# Altium PCB da12_v100.PcbDoc (part 4 of 5)
Units mil, origin at the board's own origin, x right, y up, seen from the top; angles counter-clockwise.
Board outline 4646.03 x 3622.4 mil, 4 copper layers (Top Layer, GND, POWER, Bottom Layer), stack 23.756 mil thick; 376 components, 191 nets, 1000 pads, 352 vias.
Unrouted connection lines stored in the file: 152.
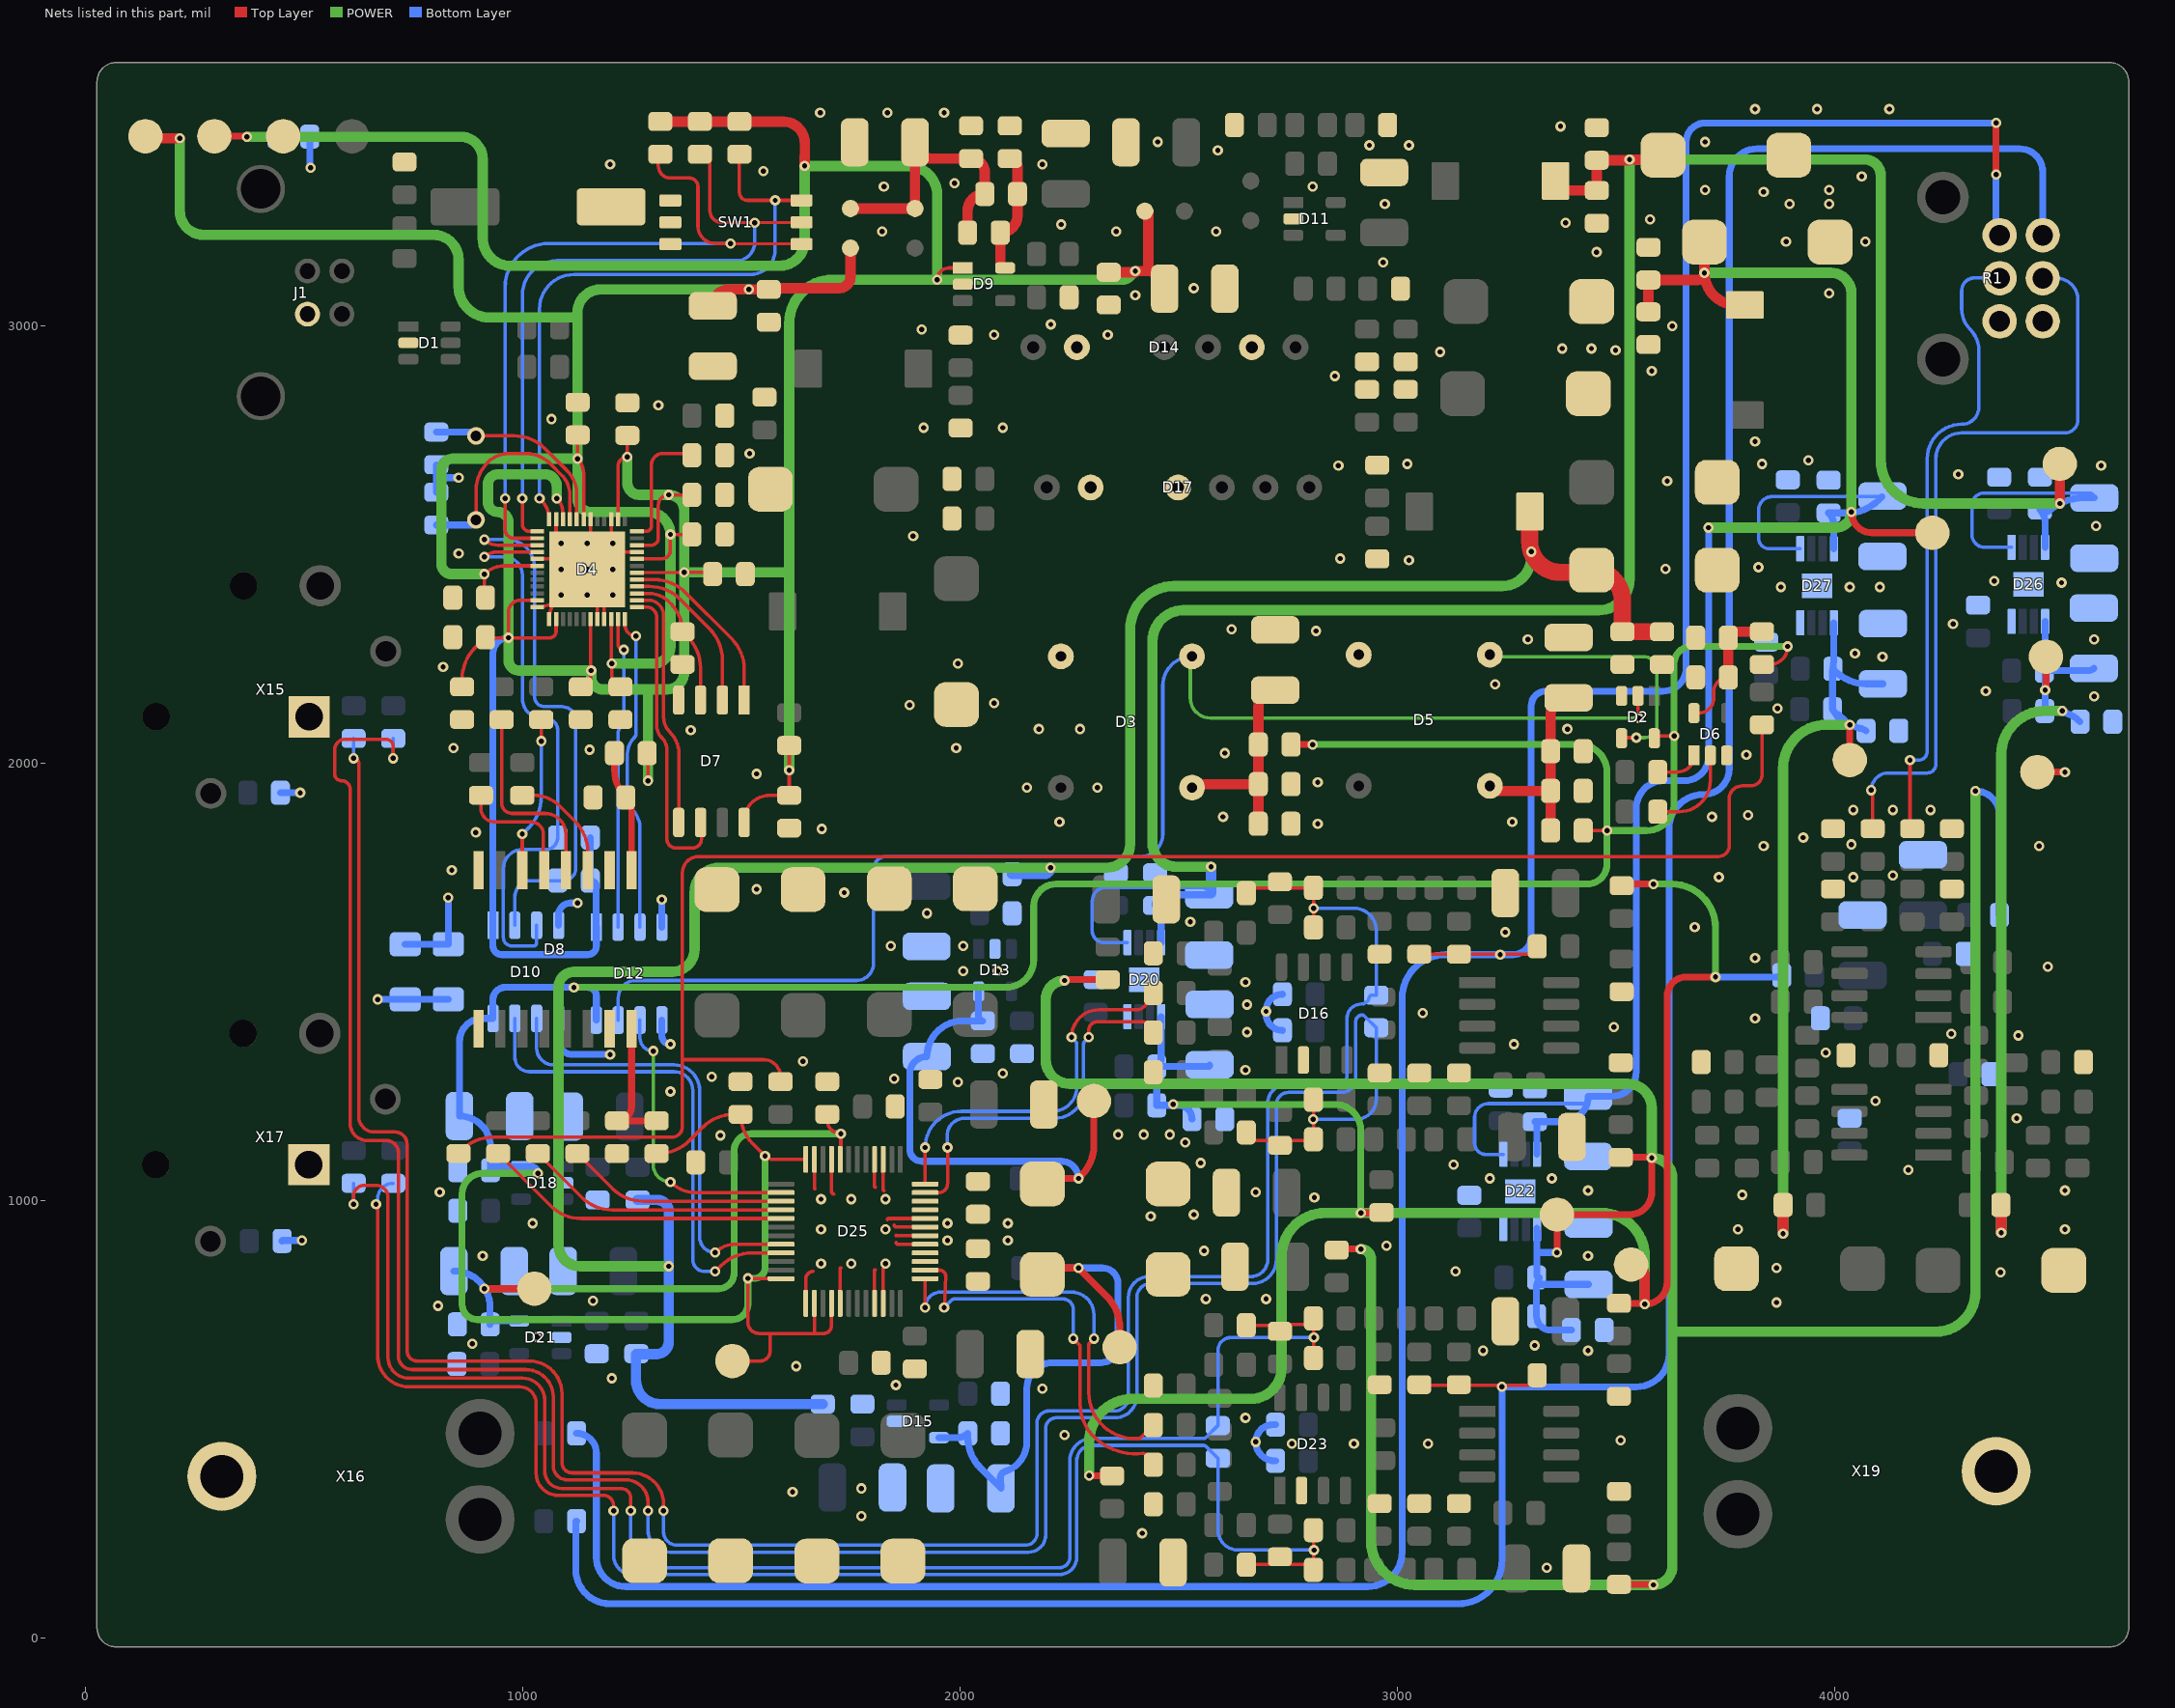
[diagram p4: the nets of this part, all layers, seen from the top]

## Via types
v1: diameter 23.62, hole 11.81, Top Layer to Bottom Layer, tented both sides, 218 vias
v2: diameter 23.62, hole 11.81, Top Layer to Bottom Layer, 134 vias

## Nets (pads, with @x,y where several pads share a name; then routed paths per layer and width w, separated by ;. In a path a pad name is that pad's centre, name@x,y a point inside that pad or via, vN(x,y) a via of type N, cw(c..) or ccw(c..) an arc to the next point about the centre after c; other vN are vias at no path point) (continued)
NetC12_1: C12.1 D4.8 X7.1 | length 449.9
  Top Layer w7.87: X7.1@894.09,2749.21 981.02,2749.21 cw(c981.02,2649.21) 1051.73,2719.92 1102.36,2669.29 cw(c1049.14,2616.06) 1124.41,2616.06 D4.8@1124.41,2558.27
  Bottom Layer w15.75: C12.1@803.15,2757.87 885.43,2757.87 cw(c885.43,2749.21) X7.1@894.09,2749.21
NetC13_2: C13.2 D4.9 X7.2 | length 534
  Top Layer w7.87: X7.2@894.09,2557.09 894.09,2623.39 cw(c986.84,2623.39) 921.26,2688.98 cw(c968.78,2641.45) 968.78,2708.66 1007.87,2708.66 cw(c1007.87,2629.36) 1063.95,2685.43 1091.18,2658.2 cw(c1049.14,2616.06) 1100.64,2645.9 cw(c1093.82,2641.98) 1100.85,2645.51 cw(c1033.39,2612.13) 1108.66,2612.13 D4.9@1108.66,2558.27
  Bottom Layer w15.75: C13.2@803.15,2545.28 882.28,2545.28 ccw(c882.28,2557.09) X7.2@894.09,2557.09
NetC14_1: C14.1 C15.1 D6.5 L4.1 | length 306.4
  Top Layer w7.87: D6.5@3679.13,2115.35 3690.16,2115.35 ccw(c3690.16,2149.61) 3724.41,2149.61 3724.41,2163.39 cw(c3757.87,2163.39) C14.1@3757.87,2196.85
  Top Layer w23.62: C14.1@3757.87,2196.85 C15.1@3757.87,2287.4 cw(c3771.65,2287.4) 3771.65,2301.18 L4.1@3834.65,2301.18
NetC28_2: C28.2 D8.1 L5.2 | length 278.2
  Top Layer w15: L5.2@1210.63,2023.62 1210.63,1985.17 ccw(c1299.35,1985.17) C28.2@1236.61,1922.44 cw(c1204.77,1890.6) 1249.8,1890.6 D8.1@1249.8,1755.91
NetC29_1: C29.1 D8.16 L6.1 | length 320.1
  Top Layer w15.75: C29.1@1216.54,1183.07 C29.1@1216.65,1183.07 ; D8.16@1249.8,1393.7 1249.8,1216.34 cw(c1216.54,1216.34) C29.1@1216.65,1183.07 ; L6.1@1307.09,1183.07 C29.1@1216.65,1183.07
NetC31_1: C31.1 C32.2 C33.2 L7.2 L8.1 R30.1 | length 658.3
  Top Layer w23.62: L7.2@1750.39,3268.9 L8.1@1898.03,3268.9 C31.1@1898.03,3420.47 ccw(c1935.43,3420.47) 1935.43,3383.07 C32.2@2025.98,3383.07 cw(c2025.98,3351.57) 2057.48,3351.57 C33.2@2057.48,3302.36 ccw(c2057.48,3262.99) 2018.11,3262.99 R30.1@2018.11,3213.78
NetC33_1: C33.1 D9.5 R28.1 R30.2 | length 288.9
  Top Layer w23.62: D9.5@2103.94,3133.07 cw(c2103.94,3144.09) 2092.91,3144.09 R30.2@2092.91,3213.78 ccw(c2092.91,3253.15) 2132.28,3253.15 C33.1@2132.28,3302.36 2132.28,3365.35 ccw(c2114.57,3365.35) R28.1@2114.57,3383.07

## Text inside footprints (layer, text, board x,y; h text height)
X15: Mechanical 13 "PANEL EDGE" at -7.09,2768.5 h50 r90
X17: Mechanical 13 "PANEL EDGE" at -7.87,1744.49 h50 r90